# Altium PCB SecondaryBoard_2.0.PcbDoc
Units mil, origin at the board's own origin, x right, y up, seen from the top; angles counter-clockwise.
Board outline 354.33 x 590.55 mil, 2 copper layers (Top Layer, Bottom Layer); 11 components, 13 nets, 84 pads, 19 vias.
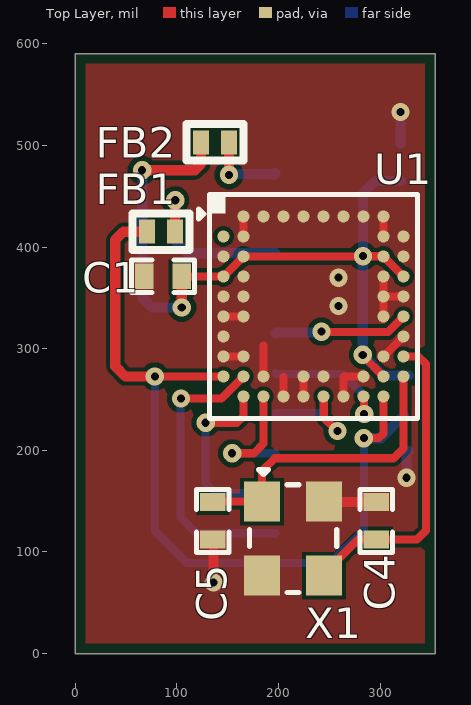
[diagram p0: Top Layer view]
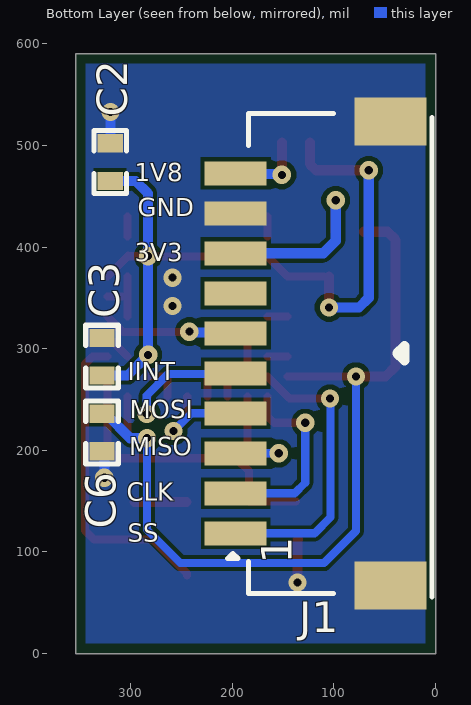
[diagram p1: Bottom Layer view, seen from below]
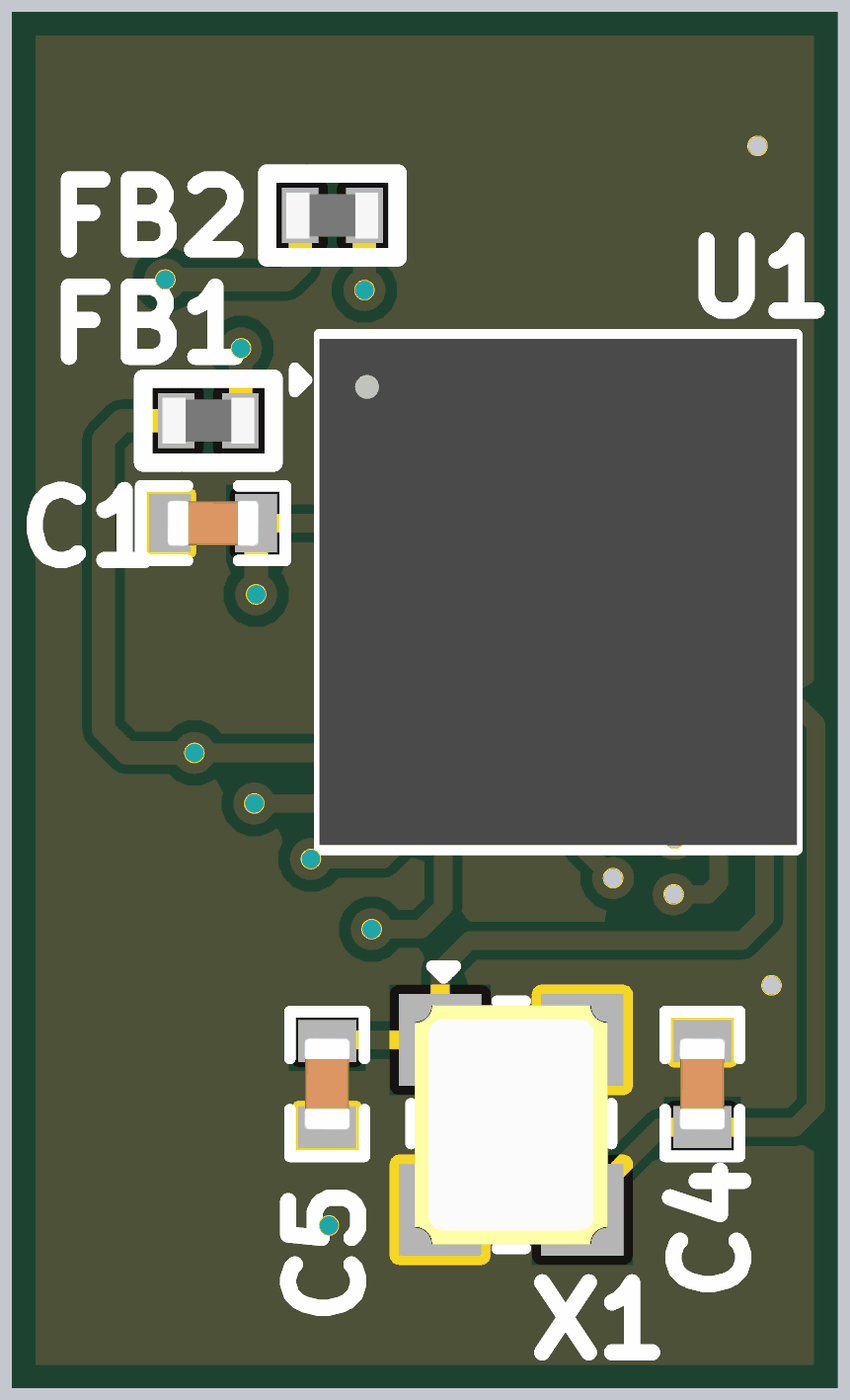
[diagram p2: 3D render of the assembled board from above, using the file's embedded part models]
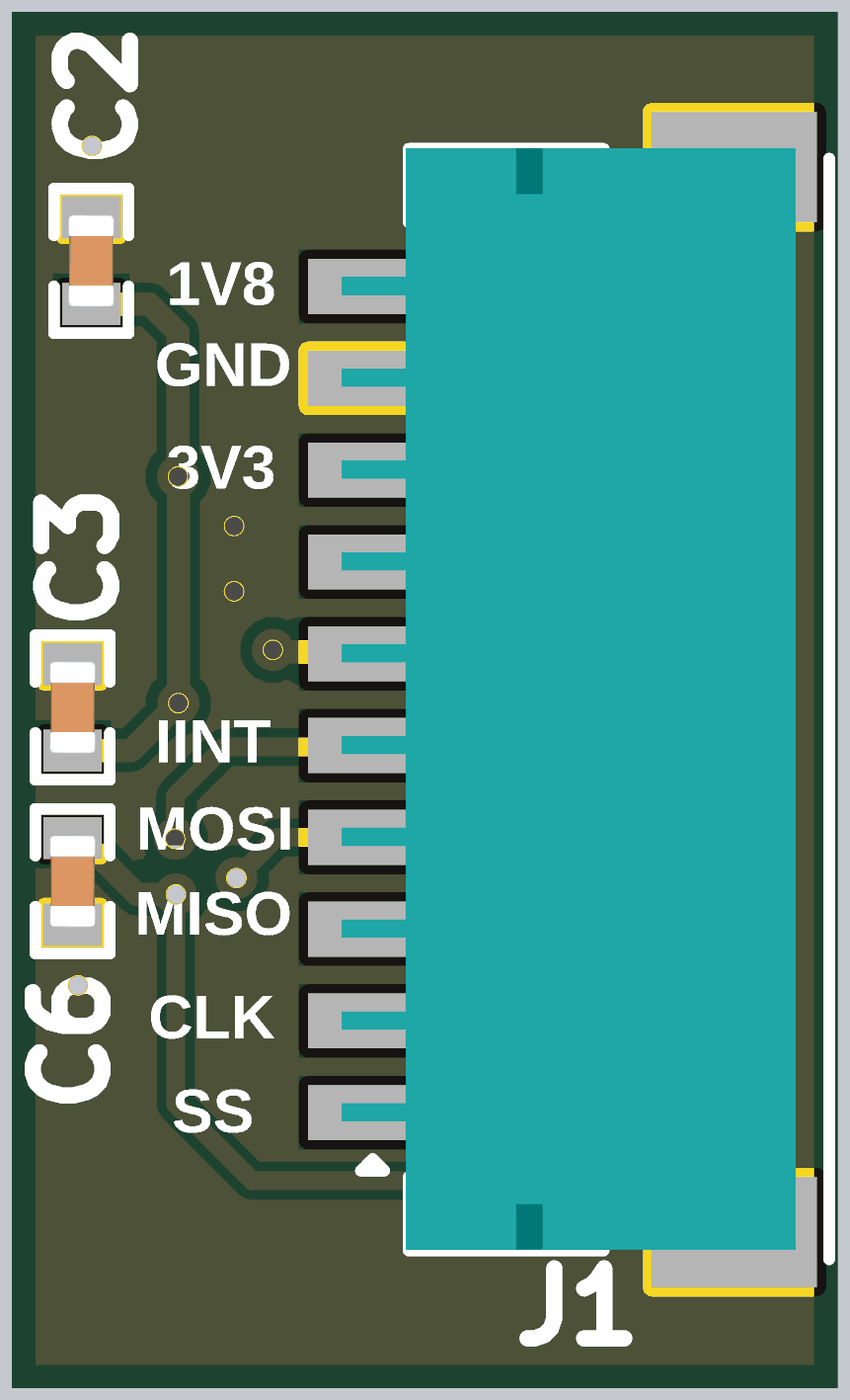
[diagram p3: 3D render of the assembled board from below, using the file's embedded part models]

## Layer stack, top to bottom
Top Solder: solder mask 0.4, Solder Resist, Dk 3.5
Top Layer: signal copper 1.4
Dielectric 1: dielectric 12.6, FR-4, Dk 4.8
Bottom Layer: signal copper 1.4
Bottom Solder: solder mask 0.4, Solder Resist, Dk 3.5

## Board outline
0,0 0,590.55 354.33,590.55 354.33,0

## Design rules (kind name [scope] priority, off if disabled: settings)
BoardOutlineClearance [All] p1: gap=0 ignorepadtopadclearanceinfootprint=FALSE except(10: Poly-OutlineEdge)
Clearance [All] p1: gap=4 ignorepadtopadclearanceinfootprint=FALSE except(5: Arc-Via Track-Via SMDPad-Via THPad-Via Via-Via Via-Fill Via-Poly Via-Region Via-Text; 9.84: Arc-Hole Track-Hole SMDPad-Hole THPad-Hole Via-Hole Fill-Hole Poly-Hole Region-Hole Text-Hole)
HoleToHoleClearance [All] p1: gap=2 allowstackedmicrovias=TRUE
MinimumSolderMaskSliver [All] p1: minsoldermaskwidth=0
PolygonConnect [All] p1: connectstyle=Direct reliefconductorwidth=10 reliefentries=4 polygonreliefangle="90 Angle" airgapwidth=10
RoutingVias [All] p1: holewidth=8 width=18 viastyle="Through Hole" minholewidth=7.87 minwidth=17.72 maxholewidth=248.03 maxwidth=257.87
SilkToSilkClearance [All] p1: silktosilkclearance=0
SilkToSolderMaskClearance [IsPad] p1: minsilkscreentomaskgap=0 clearancetoexposedcopper=TRUE
SolderMaskExpansion [All] p1: expansion=4 istentingtop=FALSE
UnRoutedNet [All] p1: checkbadconnections=TRUE
Width [All] p1: maxlimit=71497.94 minlimit=4 preferedwidth=4
25 further rules are at their usual default settings.

## Components (designator, comment, footprint, x,y, rotation, side; value= is the part's Value field where it differs from the comment)
C1 "1uF" Cap-0402 86.3,371.19 r180 top
C2 "1uF" Cap-0402 320.3,483.69 r90 bottom
C3 "1uF" Cap-0402 328.3,292.19 r90 bottom
C4 "8pF" Cap-0402 296.3,130.69 r270 top
C5 "8pF" Cap-0402 135.3,130.69 r90 top
C6 "1uF" Cap-0402 328.3,217.69 r270 bottom
FB1 "BLM15PD121SN1D" IND-0402 84.3,415.19 r0 top
FB2 "BLM15PD121SN1D" IND-0402 137.52,503.19 r0 top
J1 "SM10B-SRSS-TB(LF)(SN)" SM10B-SRSS-TB(LF)(SN) 120.58,295.54 r90 bottom locked
U1 "A121-001-T&R" "50-FCCSP (5.2X5.5)" 234.4,341.66 r0 top
X1 "ECS-240-8-36-RWN-TR3" SMD2520-4P 214.3,113.19 r270 top

## Footprints (in the part's own frame and the unit in brackets; to place one, negate y for a bottom-side part, rotate by r counter-clockwise, add the part's x,y. Pads: shape width x height; smd on the part's side, far side on the other; paste and mask are expansions set on the pad)
"50-FCCSP (5.2X5.5)" [mm]
  round 0.3 smd mask+0.04: A2(-1.75,2.25) A3(-1.25,2.25) A4(-0.75,2.25) A5(-0.25,2.25) A6(0.25,2.25) A7(0.75,2.25) A8(1.25,2.25) A9(1.75,2.25) B1(-2.25,1.75) B2(-1.75,1.75) B9(1.75,1.75) B10(2.25,1.75) C1(-2.25,1.25) C2(-1.75,1.25) C9(1.75,1.25) C10(2.25,1.25) D1(-2.25,0.75) D2(-1.75,0.75) D9(1.75,0.75) D10(2.25,0.75) E1(-2.25,0.25) E2(-1.75,0.25) E9(1.75,0.25) E10(2.25,0.25) F1(-2.25,-0.25) F2(-1.75,-0.25) F9(1.75,-0.25) F10(2.25,-0.25) G1(-2.25,-0.75) G10(2.25,-0.75) H1(-2.25,-1.25) H2(-1.75,-1.25) H9(1.75,-1.25) H10(2.25,-1.25) J1(-2.25,-1.75) J2(-1.75,-1.75) J3(-1.25,-1.75) J5(-0.25,-1.75) J6(0.25,-1.75) J8(1.25,-1.75) J9(1.75,-1.75) J10(2.25,-1.75) K2(-1.75,-2.25) K3(-1.25,-2.25) K4(-0.75,-2.25) K5(-0.25,-2.25) K6(0.25,-2.25) K7(0.75,-2.25) K8(1.25,-2.25) K9(1.75,-2.25)
  silkscreen extent -2.87,-2.8 2.6,2.8, body extent -2.6,-2.76 2.6,2.76, height 0.89
Cap-0402 [mil]
  rect 18x25 smd mask+2.36: 1(-18.5,0) 2(18.5,0)
  silkscreen extent -31,-16 31,16, body extent -20,-10 20,10, height 19
IND-0402 [mm]
  rect 0.4x0.6 smd: 1(-0.35,0) 2(0.35,0)
  silkscreen extent -0.71,-0.46 0.71,0.46, body extent -0.5,-0.25 0.5,0.25, height 0.25
SM10B-SRSS-TB(LF)(SN) [mm]
  rect 0.6x1.55 smd paste+0: 1(-4.5,1.938) 2(-3.5,1.938) 3(-2.5,1.938) 4(-1.5,1.938) 5(-0.5,1.938) 6(0.5,1.938) 7(1.5,1.938) 8(2.5,1.938) 9(3.5,1.938) 10(4.5,1.938)
  rect 1.2x1.8 smd paste+0: MP1(-5.8,-1.937) MP2(5.8,-1.937)
  silkscreen extent -6.1,-2.97 6,2.13, body extent -5.99,-2.61 6.01,2.34, height 2.96
SMD2520-4P [mm]
  rect 1x0.9 smd: 1(-0.925,-0.775) 2(0.925,-0.775) 3(0.925,0.775) 4(-0.925,0.775)
  silkscreen extent -1.73,-1.09 1.35,1.09, body extent -1.3,-1.05 1.3,1.05, height 0.55

## Part data
C1 C2 C3 C6: library part CC0402KRX5R6BB105, "CAP CER 1UF 10V X5R 0402", Case Code (Imperial)=0402, Case Code (Metric)=1005, Dielectric=X5R, LCSC Part Number=C106254, Manufacturer=Yageo, Max Operating Temperature=85°C, Min Operating Temperature=-55°C, Package Quantity=1, Resistor Type=Ceramic, Supplier Part Number 1=603-CC402KRX5R6BB105, Tolerance=10%, Voltage Rating=10V, Capacitance=1uF, Case/Package=0402, Category="Ceramic Capacitors", ComponentLink1Description=https://datasheet.ciiva.com/176/upy-gphc-x5r-4v-to-50v-12-176704.pdf?src-supplier=Digi-Key, ComponentLink1URL=https://datasheet.ciiva.com/176/upy-gphc-x5r-4v-to-50v-12-176704.pdf?src-supplier=Digi-Key, ComponentLink2Description=https://datasheet.ciiva.com/176/mlccorderingcode-176705.pdf?src-supplier=Digi-Key, ComponentLink2URL=https://datasheet.ciiva.com/176/mlccorderingcode-176705.pdf?src-supplier=Digi-Key, ComponentLink3Description=https://datasheet.ciiva.com/176/mlccorderingcode-176706.pdf?src-supplier=Digi-Key, ComponentLink3URL=https://datasheet.ciiva.com/176/mlccorderingcode-176706.pdf?src-supplier=Digi-Key, Construction=Flat, Depth=0.5mm, Dissipation Factor=15%, Halogen Free="Halogen Free", Height=0.5mm, Item Type=Capacitor, Lead Free="Lead Free", Length=1mm, Manufacturer Part Number=CC0402KRX5R6BB105, Mount="Surface Mount", Number of Pins=2, Packaging="Tape and Reel", Pricing 1="1=0.11000, 10=0.05500, 50=0.05500, 100=0.03300, 500=0.02700, 1000=0.02200, 2500=0.02100, 10000=0.01800 (USD)", Radiation Hardening=No, REACH SVHC="No SVHC", RoHS=Yes, RoHS Compliant=Yes, Series=CC, Stock 1=6711367, Supplier 1=Mouser, Termination=SMD/SMT, Thickness=0.022inch, Voltage Rating (DC)=10V, Width=0.02inch
C4 C5: library part 0402CG8R0C500NT, "50V 8pF C0G 0402 Multilayer Ceramic Capacitors MLCC - SMD/SMT ROHS", LCSC Part Number=C1578, Manufacturer="FH (Guangdong Fenghua Advanced Tech)", Package=0402, ComponentLink1Description=LCSC, ComponentLink1URL=https://www.lcsc.com/product-detail/Multilayer-Ceramic-Capacitors-MLCC-SMD-SMT_FH-Guangdong-Fenghua-Advanced-Tech-0402CG8R0C500NT_C1578.html, Item Type=Capacitor, Manufacturer Part Number=0402CG8R0C500NT
FB1 FB2: "FERRITE BEAD 120 OHM 0402 1LN", Case Code (Imperial)=0402, Case Code (Metric)=1005, Current Rating=1.3A, DC Resistance (DCR)=90mR, LCSC Part Number=C76891, Manufacturer=Murata, Max Operating Temperature=125°C, Min Operating Temperature=-55°C, Package Quantity=1, Test Frequency=100MHz, Tolerance=25%, Case/Package=0402, Category="Ferrite Beads and Chips", ComponentLink1Description=https://datasheet.ciiva.com/11800/0900766b811b5866-11800860.pdf?src-supplier=RSComponents, ComponentLink1URL=https://datasheet.ciiva.com/11800/0900766b811b5866-11800860.pdf?src-supplier=RSComponents, ComponentLink2Description=https://datasheet.ciiva.com/18093/getdatasheetpartid-195858-18093157.pdf?src-supplier=Verical, ComponentLink2URL=https://datasheet.ciiva.com/18093/getdatasheetpartid-195858-18093157.pdf?src-supplier=Verical, ComponentLink3Description=https://datasheet.ciiva.com/41425/001171686-da-01-en-chip-drossel0402-120r-1300ma-1-0x0-5mm-41425776.pdf?src-supplier=Conrad, ComponentLink3URL=https://datasheet.ciiva.com/41425/001171686-da-01-en-chip-drossel0402-120r-1300ma-1-0x0-5mm-41425776.pdf?src-supplier=Conrad, ComponentLink4Description=https://datasheet.ciiva.com/41449/001172205-da-01-en-drossel-0402-120r-11-0x0-5mm-10000st-41449495.pdf?src-supplier=Conrad, ComponentLink4URL=https://datasheet.ciiva.com/41449/001172205-da-01-en-drossel-0402-120r-11-0x0-5mm-10000st-41449495.pdf?src-supplier=Conrad, ComponentLink5Description=https://datasheet.ciiva.com/1012/l0110e-1012435.pdf?src-supplier=Digi-Key, ComponentLink5URL=https://datasheet.ciiva.com/1012/l0110e-1012435.pdf?src-supplier=Digi-Key, ComponentLink6Description=https://datasheet.ciiva.com/1012/l0110e-1012434.pdf?src-supplier=Digi-Key, ComponentLink6URL=https://datasheet.ciiva.com/1012/l0110e-1012434.pdf?src-supplier=Digi-Key, ComponentLink7Description=https://datasheet.ciiva.com/1012/l0110e-1012436.pdf?src-supplier=Digi-Key, ComponentLink7URL=https://datasheet.ciiva.com/1012/l0110e-1012436.pdf?src-supplier=Digi-Key, Core Material=Ferrite, DC Current=1.3A, DC Resistance-Max=90mR, Depth=0.55mm, Height=0.5mm, Impedance=120R, Item Type="Ferrite Bead", Lead Free="Lead Free", Length=1mm, Manufacturer Part Number=BLM15PD121SN1D, Material=Steel,Ferrite, Max Current Rating=1.3A, Max DC Current=1.3A, Military Standard=Not, Number of Circuits=1, Number of Lines=1, Number of Pins=2, Packaging="Tape and Reel", Pricing 1="10000=0.03238, 20000=0.03063, 40000=0.02888, 60000=0.02713, 80000=0.02538, 100000=0.02363, 1000000=0.02188 (USD)", Radiation Hardening=No, Reach SVHC Compliant=Yes, RoHS=Yes, RoHS Compliant=Yes, Series=BLM15PD, Stock 1=300000, Supplier 1=Avnet, Supplier Part Number 1=BLM15PD121SN1D, Termination=SMD/SMT, Width=0.5mm
J1: "CONN HEADER SMD R/A 10POS 1MM", Color=Natural, Contact Resistance=40mR, Current Rating=1A, Flammability Rating="UL94 V-0", Housing Color=Beige, Insulation Resistance=100MR, LCSC Part Number=C160409, Manufacturer=JST, Max Operating Temperature=85°C, Max Voltage Rating (AC)=50V, Min Operating Temperature=-25°C, Supplier Part Number 1=1165778, Category=Connectors, ComponentLink1Description=https://datasheet.ciiva.com/26894/getdatasheetpartid-708886-26894682.pdf?src-supplier=Verical, ComponentLink1URL=https://datasheet.ciiva.com/26894/getdatasheetpartid-708886-26894682.pdf?src-supplier=Verical, ComponentLink2Description=https://datasheet.ciiva.com/16221/sm10b-srss-tblfsn-16221242.pdf?src-supplier=Future+Electronics, ComponentLink2URL=https://datasheet.ciiva.com/16221/sm10b-srss-tblfsn-16221242.pdf?src-supplier=Future+Electronics, ComponentLink3Description=https://datasheet.ciiva.com/11752/0900766b8082f550-11752172.pdf?src-supplier=RSComponents, ComponentLink3URL=https://datasheet.ciiva.com/11752/0900766b8082f550-11752172.pdf?src-supplier=RSComponents, ComponentLink4Description=https://datasheet.ciiva.com/712/esr-712644.pdf?src-supplier=Digi-Key, ComponentLink4URL=https://datasheet.ciiva.com/712/esr-712644.pdf?src-supplier=Digi-Key, ComponentLink5Description=https://datasheet.ciiva.com/712/esr-712645.pdf?src-supplier=Digi-Key, ComponentLink5URL=https://datasheet.ciiva.com/712/esr-712645.pdf?src-supplier=Digi-Key, ComponentLink6Description=https://datasheet.ciiva.com/730/esr-730692.pdf?src-supplier=Digi-Key, ComponentLink6URL=https://datasheet.ciiva.com/730/esr-730692.pdf?src-supplier=Digi-Key, Connector Type=Header, Contact Finish - Mating=TIN, Contact Material="Copper Alloy", Contact Plating=Tin,Lead,Copper, Contact Shape=Square, Contact Type="Male Pin", Depth=4.95mm, Fastening Type=Pull, Gender=Male, Housing Material=Polyamide, Insulation Color=Natural, Insulation Material=Nylon, Item Type="JST Connector", Lead Free="Lead Free", Lead Pitch=1mm, Length=12mm, Manufacturer Part Number=SM10B-SRSS-TB(LF)(SN), Material=Polyamide, Max Current Rating=1A, Mount="Surface Mount", Number of Contacts=10, Number of Positions=10, Number of Rows=1, Orientation="Right Angle", Packaging="Tape and Reel", Pitch=1mm, Pricing 1="3000=0.64500 (USD)", Reach SVHC Compliant=Yes, RoHS=Yes, Series=SR, Supplier 1="Future Electronics", Termination=Solder, Voltage Rating=50V, Voltage Rating (AC)=50V
U1: "RADAR SENSOR SYSTEM-IN-PACKAGE B", Manufacturer=Acconeer, Supplier Part Number=925-A121-001-T&R, Category=LDO, Item Type=IC, Manufacturer Part Number=A121-001-T&R, Pricing="1=13.72, 10=11.57, 50=10.22, 100=8.78, 1000=7.74, 10000=6.41 (USD)", RoHS=No, Stock=7442, Supplier=Mouser
X1: "CRYSTAL 24.0000MHZ 8PF SMD", Manufacturer="ECS Inc.", Package=None, Item Type=Crystal, Manufacturer Part Number=ECS-240-8-36-RWN-TR3

## Free pads (board coordinates)
  round 0.5 on Mech2: 1(354.33,590.55) 1(354.33,590.55)

## Via types
v1: diameter 18, hole 8, Top Layer to Bottom Layer, tented both sides, 19 vias

## Nets (pads, with @x,y where several pads share a name; then routed paths per layer and width w, separated by ;. In a path a pad name is that pad's centre, name@x,y a point inside that pad or via, vN(x,y) a via of type N, cw(c..) or ccw(c..) an arc to the next point about the centre after c; other vN are vias at no path point)
3.3V: C6.1 FB1.1 U1.J1 U1.K9 | length 852.5
  Top Layer w8: v1@76.89,272.76 U1.J1 ; v1(284,212) 298.61,212 303.3,216.69 U1.K9
  Top Layer w10: FB1.1 47.3,415.19 39.3,407.19 39.3,282.7 49.3,272.7 v1(78.3,272.7)
  Bottom Layer w8: v1(78.3,272.7) 78.3,120.7 109.81,89.19 251.3,89.19 284,121.89 v1(284,212) ; C6.1@323.44,234.83 C6.1@323.94,234.83
  Bottom Layer w10: v1(284,212) 300.61,212 C6.1@323.44,234.83
+1.8V: C1.1 C2.1 C3.1 FB2.1 U1.C2 U1.C9 U1.D1 U1.D10 U1.J9 | length 796
  Top Layer w8: C1.1@109.8,371.19 U1.D1 U1.C2 287.98,390.87 288.3,391.19 288.46,391.03 302.14,391.03 302.64,391.53 U1.C9 U1.D10 ; v1@282.77,294.19 v1(282.91,294.05) 282.91,293.17 U1.J9
  Top Layer w10: v1(65.8,475.69) 117.69,475.69 123.74,481.74 FB2.1 ; v1(104.8,340.69) C1.1
  Bottom Layer w10: v1(65.8,475.69) 65.8,350.2 75.31,340.69 v1(104.8,340.69) ; v1@282.91,391.19 v1(282.91,294.05) 303.27,273.69 C3.1 ; v1(283.06,391.19) 283.06,452.95 295.3,465.19 C2.1
ENABLE_RADAR: J1.6 U1.F10 | length 133.2
  Top Layer w8: v1(242.34,316.89) 242.61,316.62 307.78,316.62 U1.F10
  Bottom Layer w10: J1.6 197.69,316.05 241.5,316.05 v1(242.34,316.89)
GND: C1.2 C2.2 C3.2 C4.1 C5.1 C6.2 J1.9 J1.MP1 J1.MP2 U1.A2 U1.A3 U1.A4 U1.A5 U1.A6 U1.A7 U1.A8 U1.A9 U1.B2 U1.B9 U1.B10 U1.C1 U1.C10 U1.D2 U1.D9 U1.E1 U1.E2 U1.E9 U1.E10 U1.F1 U1.F2 U1.F9 U1.G1 U1.G10 U1.H1 U1.H2 U1.H9 U1.J3 U1.J5 U1.J6 U1.J8 U1.K4 U1.K5 U1.K7 X1.2 X1.4 | length 427
  Top Layer w8: U1.H1 U1.H2 ; U1.F1 U1.F2 ; U1.B2 U1.A2 ; U1.J3 185.19,303.19 ; U1.K4 204.87,272.15 ; U1.K5 U1.J5 ; X1.4 X1.4@245.23,149.19 ; U1.K7 263.93,272.15 264.54,272.76 U1.J8 ; U1.H9 U1.G10 ; U1.F9 U1.E9 ; U1.D9 U1.E9 ; U1.B9 U1.A9 ; U1.E10 U1.E9
  Top Layer w10: C5.1 136,111.49 v1(136,70) ; X1.4@245.23,149.19 C4.1
  Bottom Layer w10: v1@320,534 320,502.49 C2.2 ; v1(326,173) 326,196.89 C6.2
  other v1: 259,342 259,370 320,533
INTERRUPT: J1.5 U1.K8 | length 132.2
  Top Layer w8: U1.K8 283.96,252.74 283.96,236.22 v1(284.3,235.88)
  Bottom Layer w8: J1.5 197.52,275.19 263.27,275.19 284.3,254.16 v1(284.3,235.88)
NetFB1_2: FB1.2 J1.8 | length 174.7
  Top Layer w10: FB1.2 98.19,415.3 98.19,446.08 v1(98.3,446.19)
  Bottom Layer w10: v1(98.3,446.19) 98.3,406.19 110.53,393.96 J1.8
NetFB2_2: FB2.2 J1.10 | length 78.8
  Top Layer w10: v1(151.3,471.19) FB2.2
  Bottom Layer w10: v1(151.3,471.19) 152.06,471.94 194.59,471.94 195.35,471.19 J1.10
SPI_CLK: J1.2 U1.K2 | length 191.3
  Top Layer w8: v1(128.3,227.19) 159.19,227.19 165.5,233.5 U1.K2
  Bottom Layer w8: v1(128.3,227.19) 128.3,168.19 138.75,157.74 J1.2
SPI_MISO: J1.3 U1.K3 | length 123.7
  Top Layer w8: v1(154.38,197.11) 175.62,197.11 185.19,206.68 U1.K3
  Bottom Layer w8: v1(154.38,197.11) J1.3
SPI_MOSI: J1.4 U1.K6 | length 108.2
  Top Layer w8: U1.K6 244.46,252.87 244.46,232.54 v1(258,219)
  Bottom Layer w8: J1.4 240.52,236.48 v1(258,219)
SPI_SS: J1.1 U1.J2 | length 286.7
  Top Layer w8: v1(104,251) 143.74,251 U1.J2
  Bottom Layer w8: v1@103.48,250.48 103.48,134.19 119.3,118.37 J1.1
XIN: C5.2 U1.J10 X1.1 | length 295.8
  Top Layer w8: C5.2@137.3,149.61 X1.1 183.79,179.68 196.3,192.19 313.3,192.19 322.98,201.87 U1.J10
XOUT: C4.2 U1.H10 X1.3 | length 308.8
  Top Layer w8: X1.3 244.81,78.74 278.26,112.19 C4.2 336.19,112.19 345,121 345,285 337.55,292.45 U1.H10
pads on no net: J1.7 U1.B1

## Polygon pours and split planes (outlines as drawn)
GND on Bottom Layer "GND_L02_P001" (solid, remove dead copper, pour order 1): 0,0 0,590.55 354.33,590.55 354.33,0
GND on Top Layer "GND_L01_P000" (solid, remove dead copper, pour order 0): 0,0 0,590.55 354.33,590.55 354.33,0

## Silkscreen, mask and mechanical layers (free items; w line width, h text height)
Bottom Overlay:
  text "1V8" at 296,459.19 h30
  text "GND" at 293,424.54 h30
  text "3V3" at 296,380.45 h30
  text "IINT" at 303,263.34 h30
  text "MOSI" at 300.97,225.54 h30
  text "MISO" at 301.61,189.17 h30
  text "CLK" at 304,144.45 h30
  text "SS" at 303,104.08 h30
Board_Outline:
  the board outline again, w7
Fabrication Info:
  drawing of 191 lines, arcs and shapes, not listed
  text "Layer" at 675.34,341 h60
  text "Name" at 1085.26,341 h60
  text "Material" at 2015,341 h60
  text "Thickness" at 2874.77,341 h60
  text "Constant" at 3524.6,341 h60
  text "Board Layer Stack" at 4094.46,341 h60
  text "Top Overlay" at 1085.26,221 h60
  text "Top Solder" at 1085.26,101 h60
  text "Solder Resist" at 2015,101 h60
  text "0.40mil" at 2874.77,101 h60
  text "3.5" at 3524.6,101 h60
  text "1" at 675.34,-19 h60
  text "Top Layer" at 1085.26,-19 h60
  text "1.40mil" at 2874.77,-19 h60
  text "Dielectric 1" at 1085.26,-139 h60
  text "FR-4" at 2015,-139 h60
  text "12.60mil" at 2874.77,-139 h60
  text "4.8" at 3524.6,-139 h60
  text "2" at 675.34,-259 h60
  text "Bottom Layer" at 1085.26,-259 h60
  text "1.40mil" at 2874.77,-259 h60
  text "Bottom Solder" at 1085.26,-379 h60
  text "Solder Resist" at 2015,-379 h60
  text "0.40mil" at 2874.77,-379 h60
  text "3.5" at 3524.6,-379 h60
  text "Bottom Overlay" at 1085.26,-499 h60
  text "Total board thickness:" at 675.34,-619 h60
  text "16.20mil" at 2874.77,-619 h60
Drill Drawing:
  circle w10: c699.46,891.33 r33.33
  lines w15: 606.33,813 7736.39,813 ; 606.33,963 7736.39,963 ; 1157.21,663 1157.21,1113 ; 1687.07,663 1687.07,1113 ; 2726.77,663 2726.77,1113 ; 3232.65,663 3232.65,1113 ; 3966.45,663 3966.45,1113 ; 5466,663 5466,1113 ; 6055.85,663 6055.85,1113 ; 6801.65,663 6801.65,1113 ; 606.33,663 7736.39,663 7736.39,1113 606.33,1113 606.33,663
  text "Symbol" at 696.33,1008 h72
  text "Count" at 1202.21,1008 h72
  text "Hole Size" at 1732.07,1008 h72
  text "Plated" at 2771.77,1008 h72
  text "Hole Type" at 3277.65,1008 h72
  text "Drill Layer Pair" at 4011.45,1008 h72
  text "Via/Pad" at 5511,1008 h72
  text "Pad Shape" at 6100.85,1008 h72
  text "Template" at 6846.65,1008 h72
  text "19" at 1202.21,858 h60
  text "8.00mil (0.203mm)" at 1732.07,858 h60
  text "PTH" at 2771.77,858 h60
  text "Round" at 3277.65,858 h60
  text "Top Layer - Bottom Layer" at 4011.45,858 h60
  text "Via" at 5511,858 h60
  text "Rounded" at 6100.85,858 h60
  text "v46h20m0mx0(1)" at 6846.65,858 h60
  text "19 Total" at 1202.21,708 h60

## Dimensions
0,590.55 to 0,0 on Dimension
354.33,590.55 to 0,590.55 on Dimension

## Text inside footprints (layer, text, board x,y; h text height)
J1: Mechanical 13 "PCB Edge" at 26.04,138.98 h31.5 r270; Bottom Overlay "1" at 141.58,88.54 h30 r270